# Altium PCB HairColorDispenser.PcbDoc
Units mil, origin at the board's own origin, x right, y up, seen from the top; angles counter-clockwise.
Board outline 3661.42 x 3031.5 mil, 2 copper layers (Top Layer, Bottom Layer), stack 12.8 mil thick; 96 components, 84 nets, 337 pads, 99 vias.
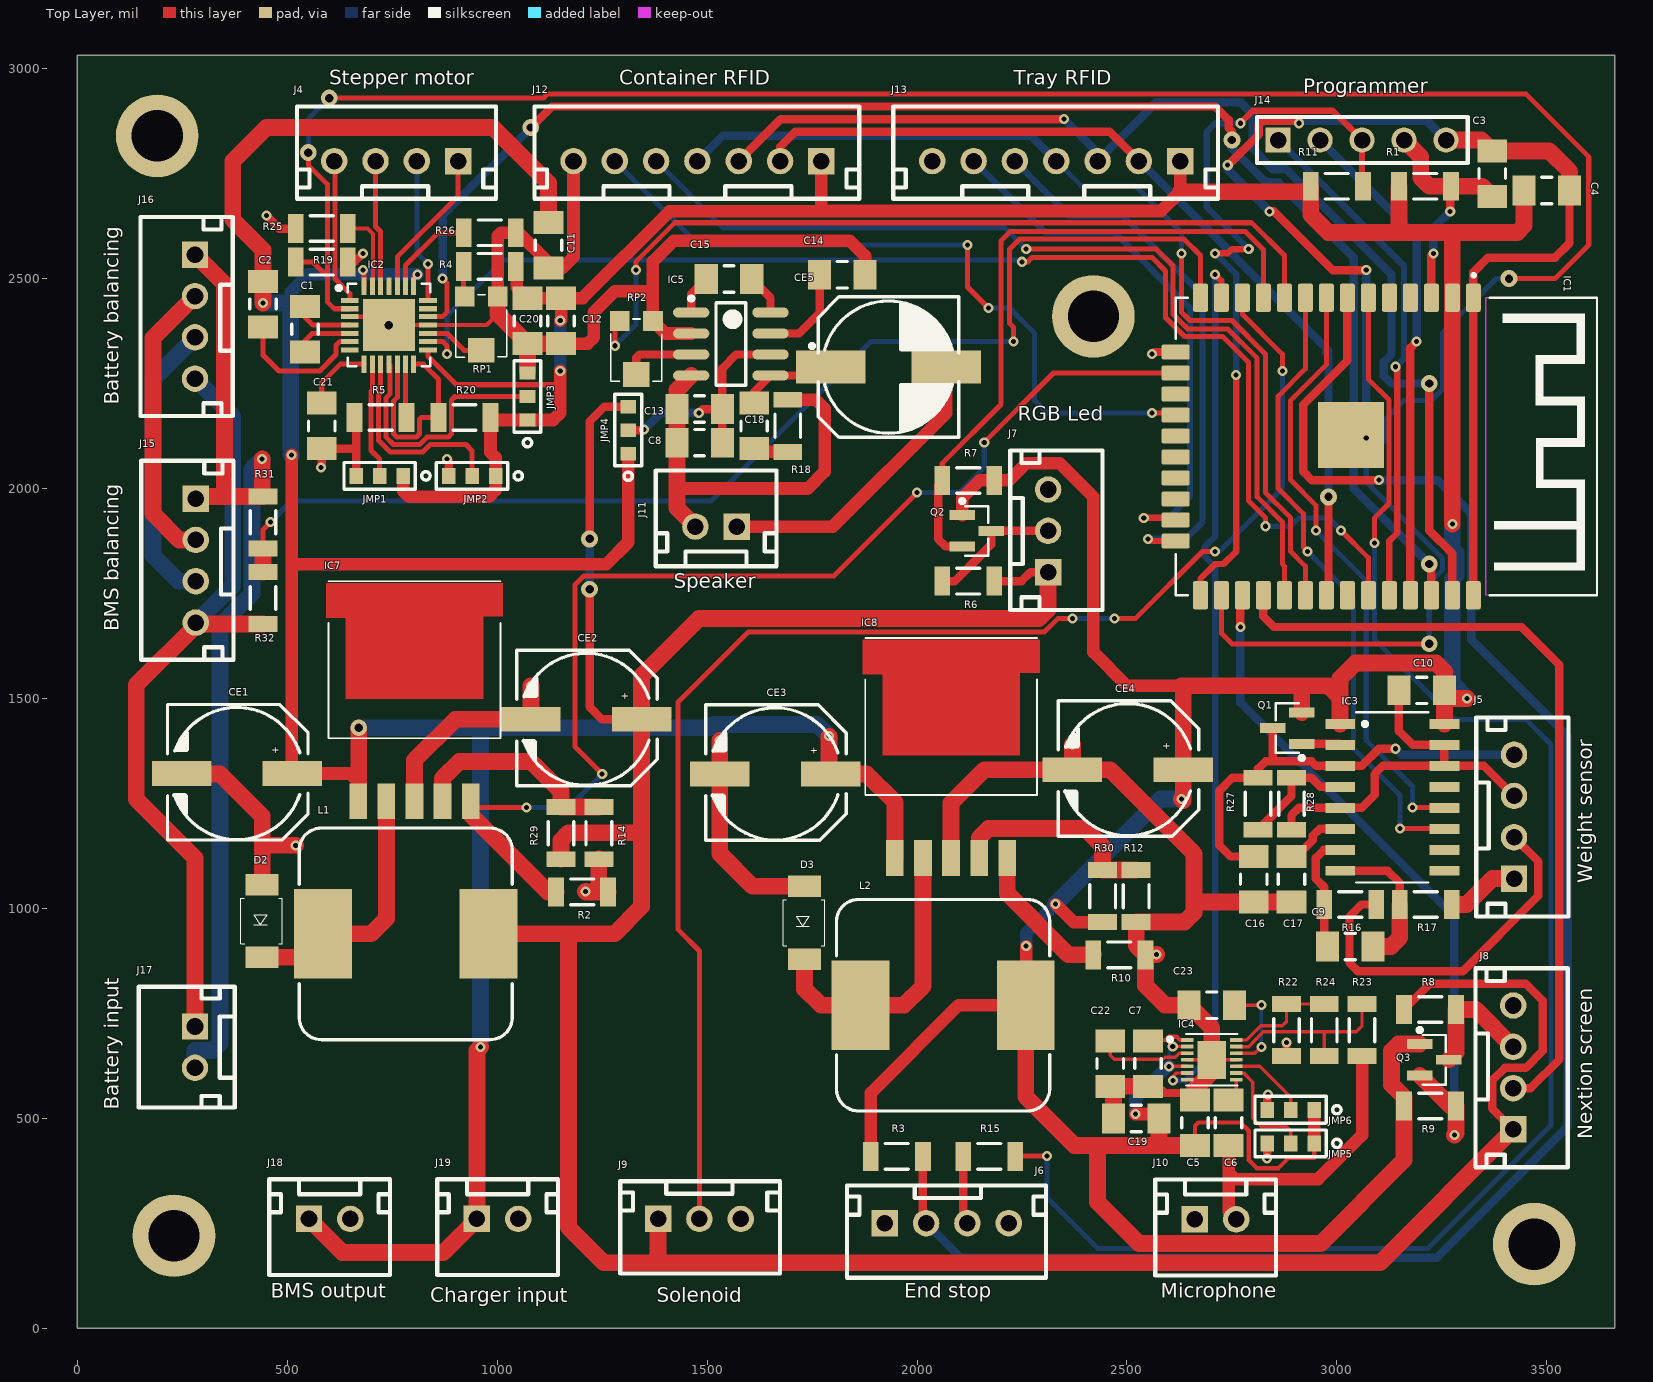
[diagram p0: Top Layer view]
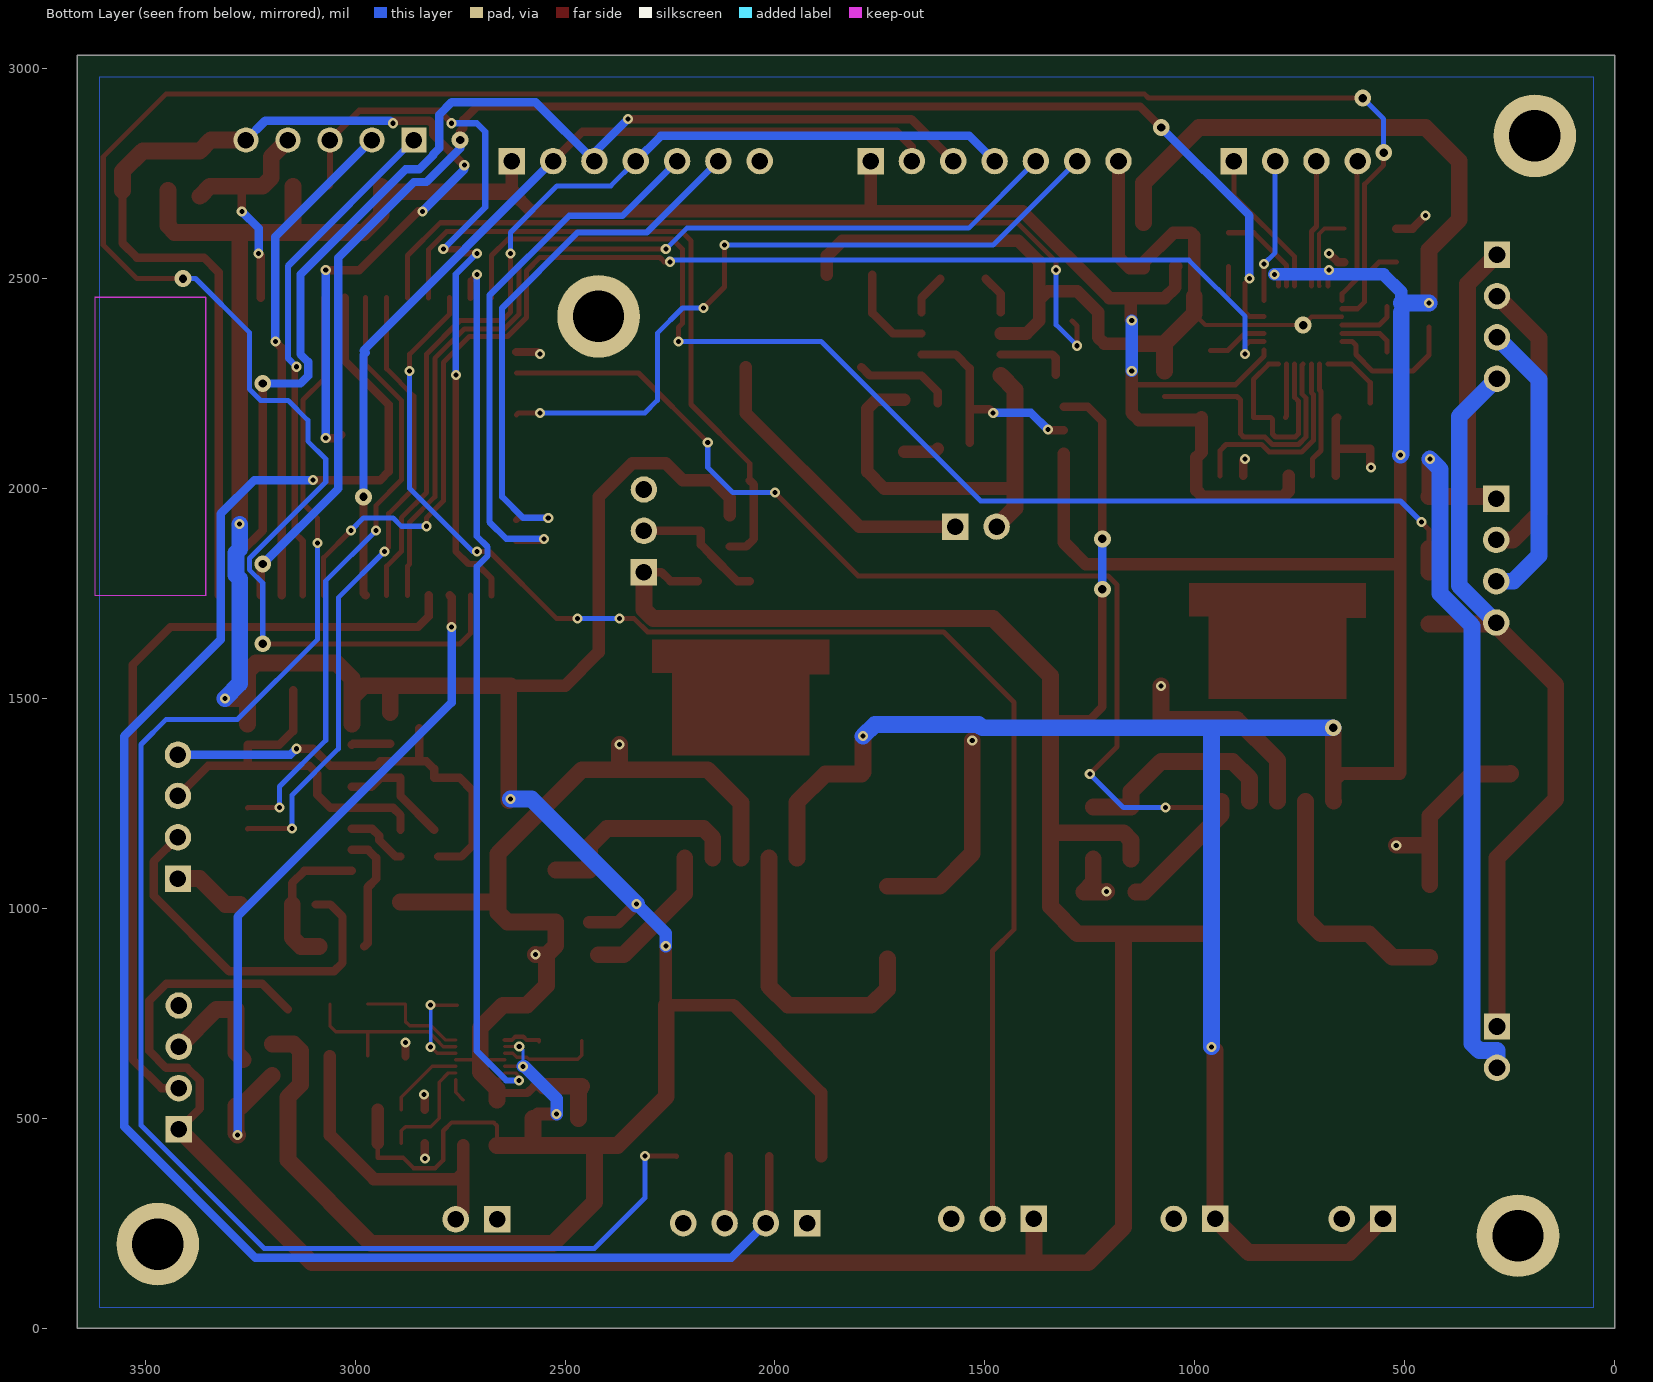
[diagram p1: Bottom Layer view, seen from below]

## Layer stack, top to bottom
Top Solder: solder mask 0.4, Solder Resist, Dk 3.5
Top Layer: signal copper 1.4
Dielectric 1: core 10, FR-4, Dk 4.2
Bottom Layer: signal copper 1.4
Solder Side: solder mask 0.4, Solder Resist, Dk 3.5

## Board outline
0,0 0,3031.5 3661.42,3031.5 3661.42,0

## Design rules (kind name [scope] priority, off if disabled: settings)
Clearance Clearance_1 [InComponent('IC2')] p1: gap=6
Clearance "Clearance Poly" [InPoly] p2: gap=16
Clearance [All] p3: gap=6
DiffPairsRouting [All] p1: maxlimit=10 minlimit=10 mostfreqgap=10 toplayer_minwidth=10 toplayer_maxwidth=10 toplayer_prefwidth=10 bottomlayer_minwidth=10 bottomlayer_maxwidth=10 bottomlayer_prefwidth=10 maxuncoupledlength=500
HoleSize [All] p1: absolutevalues=TRUE maxlimit=500 minlimit=1 maxpercent=80.000 minpercent=20.000
MinimumSolderMaskSliver [All] p1: minsoldermaskwidth=1
PolygonConnect PolygonConnect_Via [IsVia] p1: connectstyle=Direct reliefconductorwidth=10 reliefentries=4 polygonreliefangle="90 Angle" airgapwidth=10
PolygonConnect [All] p2: connectstyle=Relief reliefconductorwidth=10 reliefentries=4 polygonreliefangle="90 Angle" airgapwidth=10
RoutingVias [All] p1: holewidth=12 width=24 viastyle="Through Hole" minholewidth=12 minwidth=24 maxholewidth=100 maxwidth=100
SilkToSilkClearance [All] p1: silktosilkclearance=5
SilkToSolderMaskClearance [IsPad] p1: minsilkscreentomaskgap=5 clearancetoexposedcopper=TRUE
SolderMaskExpansion [All] p1: expansion=4
Width [All] p1: maxlimit=80 minlimit=6 preferedwidth=10
25 further rules are at their usual default settings.

## Components (designator, comment, footprint, x,y, rotation, side; value= is the part's Value field where it differs from the comment)
C1 "100n" CAPC3216X18N 541.97,2379.13 r270 top
C2 "100n" CAPC3216X18N 441.97,2439.13 r90 top
C3 "100n" CAPC3216X18N 3370,2750 r270 top
C4 "100n" CAPC3216X18N 3500,2710 r180 top
C5 "100n" CAPC3216X18N 2661.97,489.13 r270 top
C6 "100n" CAPC3216X18N 2741.97,489.13 r90 top
C7 "100n" CAPC3216X18N 2550,630 r90 top
C8 "100n" CAPC3216X18N 1481.97,2109.13 r0 top
C9 "100n" CAPC3216X18N 3031.97,909.13 r180 top
C10 "100n" CAPC3216X18N 3201.97,1519.13 r0 top
C11 "100n" CAPC3216X18N 1121.97,2579.13 r90 top
C12 "100n" CAPC3216X18N 1151.97,2399.13 r90 top
C13 "10uF" CAPC3216X18N 1481.97,2189.13 r0 top
C14 "10uF" CAPC3216X18N 1821.97,2509.13 r180 top
C15 "10uF" CAPC3216X18N 1551.97,2499.13 r0 top
C16 "1uF" CAPC3216X18N 2801.97,1069.13 r90 top
C17 "1uF" CAPC3216X18N 2891.97,1069.13 r90 top
C18 "10p" CAPC3216X18N 1611.97,2149.13 r270 top
C19 "2u2" CAPC3216X18N 2521.97,499.13 r0 top
C20 "2u2" CAPC3216X18N 1071.97,2399.13 r90 top
C21 "220n" CAPC3216X18N 581.97,2149.13 r90 top
C22 "2u2" CAPC3216X18N 2460,630 r90 top
C23 "470n" CAPC3216X18N 2701.97,769.13 r0 top
CE1 "220uF" "220uF 35V" 380,1320 r0 top
CE2 "220uF" "220uF 35V" 1211.97,1449.13 r0 top
CE3 "220uF" "220uF 35V" 1661.97,1319.13 r0 top
CE4 "220uF" "220uF 35V" 2501.97,1329.13 r0 top
CE5 "100u 25V" CAPAE800X550N 1931.97,2289.13 r0 top
D2 "1N5824" SOD128 440,970 r90 top
D3 "1N5824" SOD128 1731.97,965.75 r90 top
IC1 "ESP32-WROOM-32" MODULE_ESP-WROOM-32 3000,2100 r270 top
IC2 "A4988" "28-QFN (5x5)" 741.97,2389.13 r0 top
IC3 "HX711" SOP16 3131.97,1279.13 r0 top
IC4 "MAX9814" "14-WFDFN Exposed Pad" 2701.97,639.13 r0 top
IC5 "LM386" SOIC-8 1556.46,2344.13 r0 top
IC7 "LM2596 Adj" TO263-5 668.97,1255.13 r0 top
IC8 "LM2596 Adj" TO263-5 1947.18,1120.13 r0 top
J4 "Stepper motor" B4B-HX-A 906.85,2780 r180 top
J5 "Weight Sensor" B4B-HX-A 3421.97,1070.71 r90 top
J6 "QRD1114" B4B-HX-A 1923.15,250 r0 top
J7 "WS2812B" B3B-HX-A 2311.97,1800.71 r90 top
J8 "Nextion" B4B-HX-A 3420,473.15 r90 top
J9 "WS2812B" B3B-HX-A 1383.15,260 r0 top
J10 "Microphone" B2B-XH-A 2661.97,259.13 r0 top
J11 "Speaker" B2B-XH-A 1570.39,1909.13 r180 top
J12 "RFID Container" B7B-HX-A 1772.13,2780 r180 top
J13 "RFID Tray" B7B-HX-A 2626.85,2780 r180 top
J14 "Programmer" HEADER1X5 3010,2830 r0 top
J15 "Balancing BMS" B4B-HX-A 281.97,1975.98 r270 top
J16 "Balancing Battery" B4B-HX-A 280,2556.85 r270 top
J17 "Battery Input" B2B-XH-A 280,718.43 r270 top
J18 "BMS Output" B2B-XH-A 551.57,260 r0 top
J19 "Charger Input" B2B-XH-A 951.57,260 r0 top
JMP1 "0R" JMP_SOLDER_3 720,2030 r180 top
JMP2 "0R" JMP_SOLDER_3 940,2030 r180 top
JMP3 "0R" JMP_SOLDER_3 1071.97,2219.13 r90 top
JMP4 "0R" JMP_SOLDER_3 1311.97,2139.13 r90 top
JMP5 "0R" JMP_SOLDER_3 2890,440 r180 top
JMP6 "0R" JMP_SOLDER_3 2890,520 r180 top
L1 "33uH 3A" "33uH 3A" 781.97,939.13 r0 top
L2 "33uH 3A" "33uH 3A" 2061.97,769.13 r0 top
Q1 "MMBT4403" SOT95P230X126-3N 2881.97,1429.13 r180 top
Q2 "2N7002" SOT95P230X126-3N 2141.97,1899.13 r0 top
Q3 "2N7002" SOT95P230X126-3N 3231.97,639.13 r0 top
R1 "10K" "SMD 1206" 3210,2720 r180 top
R2 "10K" "SMD 1206" 1201.97,1039.13 r180 top
R3 "10K" "SMD 1206" 1951.97,409.13 r180 top
R4 "10K" "SMD 1206" 981.97,2529.13 r0 top
R5 "10K" "SMD 1206" 721.97,2169.13 r0 top
R6 "10K" "SMD 1206" 2121.97,1779.13 r180 top
R7 "10K" "SMD 1206" 2121.97,2019.13 r0 top
R8 "10K" "SMD 1206" 3221.97,759.13 r0 top
R9 "10K" "SMD 1206" 3221.97,529.13 r180 top
R10 "10K" "SMD 1206" 2481.97,889.13 r180 top
R11 "10K" "SMD 1206" 3000,2720 r0 top
R12 "1K" "SMD 1206" 2521.97,1029.13 r90 top
R14 "1K" "SMD 1206" 1241.97,1179.13 r90 top
R15 "100R" "SMD 1206" 2171.97,409.13 r180 top
R16 "100R" "SMD 1206" 3031.97,1009.13 r180 top
R17 "100R" "SMD 1206" 3211.97,1009.13 r180 top
R18 "100R" "SMD 1206" 1691.97,2149.13 r90 top
R19 "100K" "SMD 1206" 581.97,2539.13 r0 top
R20 "100K" "SMD 1206" 921.97,2169.13 r0 top
R22 "100K" "SMD 1206" 2880,710 r90 top
R23 "2K2" "SMD 1206" 3060,710 r270 top
R24 "150K" "SMD 1206" 2970,710 r270 top
R25 "0R05" "SMD 1206" 581.97,2619.13 r180 top
R26 "0R05" "SMD 1206" 981.97,2609.13 r0 top
R27 "20K" "SMD 1206" 2811.97,1249.13 r270 top
R28 "8.2K" "SMD 1206" 2891.97,1249.13 r90 top
R29 "3.09K" "SMD 1206" 1151.97,1179.13 r90 top
R30 "1.69K" "SMD 1206" 2441.97,1029.13 r90 top
R31 "33K" "SMD 1206" 441.97,1919.13 r90 top
R32 "10K" "SMD 1206" 441.97,1739.13 r90 top
RP1 "10K" "SMD POT" 1001.34,2457.09 r180 top
RP2 "10K" "SMD POT" 1370.71,2399.13 r180 top

## Footprints (in the part's own frame and the unit in brackets; to place one, negate y for a bottom-side part, rotate by r counter-clockwise, add the part's x,y. Pads: shape width x height; smd on the part's side, far side on the other; paste and mask are expansions set on the pad)
"14-WFDFN Exposed Pad" [mm] "14-WFDFN Exposed Pad (3x3)"
  rect 0.76x0.22 smd: 1(-1.485,1.2) 2(-1.485,0.8) 3(-1.485,0.4) 4(-1.485,0) 5(-1.485,-0.4) 6(-1.485,-0.8) 7(-1.485,-1.2) 8(1.485,-1.2) 9(1.485,-0.8) 10(1.485,-0.4) 11(1.485,0) 12(1.485,0.4) 13(1.485,0.8) 14(1.485,1.2)
  rect 1.7x2.3 smd: 15(0,0)
  silkscreen extent -2.65,-1.55 1.55,1.55, body extent -1.51,-1.5 1.5,1.5, height 0.73
"28-QFN (5x5)" [mil] "28-VFQFN Exposed Pad (5x5)"
  rect 42x12 smd: 1(-93,59) 2(-93,39) 3(-93,20) 4(-93,0) 5(-93,-20) 6(-93,-39) 7(-93,-59) 15(93,-59) 16(93,-39) 17(93,-20) 18(93,0) 19(93,20) 20(93,39) 21(93,59)
  rect 12x42 smd: 8(-59,-93) 9(-39,-93) 10(-20,-93) 11(0,-93) 12(20,-93) 13(39,-93) 14(59,-93) 22(59,93) 23(39,93) 24(20,93) 25(0,93) 26(-20,93) 27(-39,93) 28(-59,93)
  rect 124x124 smd: 29(0,0)
  silkscreen extent -124,-98 98,98, body extent -98,-98 98,98, height 39
"33uH 3A" [mm] "Precision Wire Wound Inductor, 2-Leads, Body 12.5x12.5mm, IPC Low Density"
  rect 3.5x5.4 smd: 1(-5,0) 2(5,0)
  silkscreen extent -6.45,-6.4 6.45,6.4, body extent -6.25,-6.25 6.25,6.25, height 7.5
"220uF 35V" [mm] "Molded Capacitor, 2-Leads, Body 8x10mm, IPC Medium Density"
  rect 3.6x1.5 smd: 1(3.35,0.025) 2(-3.35,0.025)
  silkscreen extent -4.2,-4 4.3,4.2, body extent -4,-3.97 4,4.03, height 10
B2B-XH-A [mm]
  rect 1.6x1.6 hole 1: 1(0,0)
  round 1.6 hole 1: 2(2.5,0)
  silkscreen extent -2.4,-3.4 4.9,2.4, body extent -2.45,-3.38 4.95,2.37, height 7
B3B-HX-A [mm] "HEADER, TOP ENTRY, 3WAY, 2MM"
  rect 1.6x1.6 hole 1: 1(0,0)
  round 1.6 hole 1: 2(2.5,0) 3(5,0)
  silkscreen extent -2.29,-3.3 7.37,2.29, body extent -2.41,-3.38 7.49,2.37, height 7
B4B-HX-A [mm] "HEADER, TOP ENTRY, 4WAY, 2MM"
  rect 1.6x1.6 hole 1: 1(0,0)
  round 1.6 hole 1: 2(2.5,0) 3(5,0) 4(7.5,0)
  silkscreen extent -2.29,-3.3 9.75,2.29, body extent -2.44,-3.31 9.96,2.44, height 7
B7B-HX-A [mm] "HEADER, TOP ENTRY, 4WAY, 2MM"
  rect 1.6x1.6 hole 1: 1(0,0)
  round 1.6 hole 1: 2(2.5,0) 3(5,0) 4(7.5,0) 5(10,0) 6(12.5,0) 7(15,0)
  silkscreen extent -2.29,-3.3 17.37,2.29, body extent -2.4,-3.4 17.49,2.37, height 7
CAPAE800X550N [mm] "Molded Capacitor, 2-Leads, Body 8.3x8.3mm, IPC Medium Density"
  rect 4.2x2 smd: 1(-3.5,0) 2(3.5,0)
  silkscreen extent -4.75,-4.25 4.25,4.25, body extent -4.02,-3.99 3.98,4.01, height 5.5
CAPC3216X18N [mm] "Chip Capacitor, 2-Leads, Body 3.20x1.60mm, IPC Medium Density"
  rect 1.4x1.8 smd: 1(-1.375,0) 2(1.375,0)
  silkscreen extent -0.3,-0.8 0.3,0.8, body extent -1.68,-0.87 1.67,0.87, height 1.8
HEADER1X5 [mil]
  rect 60x60 hole 39.37: 1(-150,0)
  round 60 hole 39.37: 2(-50,0) 3(50,0) 4(150,0) 5(250,0)
  silkscreen extent -200,-55 302,55, body extent -200,-50 300,50, height 286
JMP_SOLDER_3 [mil] "3 X 0603"
  rect 32x38 smd: 1(-56,0) 2(0,0)
  rect 32x38 smd paste+0 mask+0: 3(56,0)
  silkscreen extent -120,-32 85,32, body extent -72,-19 16,19, height 24
MODULE_ESP-WROOM-32 [mm]
  rrect22% 1.7x0.9 smd: 1(-9,8.255) 2(-9,6.985) 3(-9,5.715) 4(-9,4.445) 5(-9,3.175) 6(-9,1.905) 7(-9,0.635) 8(-9,-0.635) 9(-9,-1.905) 10(-9,-3.175) 11(-9,-4.445) 12(-9,-5.715) 13(-9,-6.985) 14(-9,-8.255) 25(9,-8.255) 26(9,-6.985) 27(9,-5.715) 28(9,-4.445) 29(9,-3.175) 30(9,-1.905) 31(9,-0.635) 32(9,0.635) 33(9,1.905) 34(9,3.175) 35(9,4.445) 36(9,5.715) 37(9,6.985) 38(9,8.255)
  rect 4x4 smd: 1.1(-0.7,0.845)
  rrect22% 0.9x1.7 smd: 15(-5.715,-9.755) 16(-4.445,-9.755) 17(-3.175,-9.755) 18(-1.905,-9.755) 19(-0.635,-9.755) 20(0.635,-9.755) 21(1.905,-9.755) 22(3.175,-9.755) 23(4.445,-9.755) 24(5.715,-9.755)
  Keep-Out Layer region: 9,9.026 -9.026,9.026 -9.026,15.75 9,15.75
  Keep-Out Layer region: 9,9.012 -9.012,9.012 -9.012,15.75 9,15.75
  Keep-Out Layer region: 9,9.024 -9.024,9.024 -9.024,15.75 9,15.75
  silkscreen extent -10.46,-9.75 9,15.75, body extent -9.05,-9.8 9.02,15.74, height 3
"SMD 1206" [mm]
  rect 0.95x1.75 smd: 1(-1.575,0) 2(1.575,0)
  silkscreen extent -0.7,-0.77 0.7,0.77, body extent -1.6,-0.85 1.6,0.85, height 0.55
"SMD POT" [mm]
  rect 1.2x1.2 smd: 1(0,0) 3(2,0)
  rect 1.6x1.5 smd: 2(1,3.25)
  silkscreen extent -0.54,-0.12 2.55,3.66, body extent -0.54,-0.13 2.56,3.65, height 1.01
SOD128 [mm] "SOD128"
  rect 1.3x2 smd: 1(-2.2,0) 2(2.2,0)
  silkscreen extent -1.39,-1.22 1.38,1.3, body extent -2.45,-1.35 2.55,1.35, height 1.1
SOIC-8 [mm] "SOIC, 8-Leads, Body 5.0x4.0mm (max), Pitch 1.27mm, IPC Medium Density"
  oval 2.2x0.6 smd: 1(-2.4,1.905) 2(-2.4,0.635) 3(-2.4,-0.635) 4(-2.4,-1.905) 5(2.4,-1.905) 6(2.4,-0.635) 7(2.4,0.635) 8(2.4,1.905)
  silkscreen extent -2.52,-2.5 0.9,2.88, body extent -2,-2.5 2,2.5, height 1.75
SOP16 [mm] "SOIC, 8-Leads, Body 5.0x4.0mm (max), Pitch 1.27mm, IPC Medium Density"
  rect 1.8x0.59 smd: 1(-3.155,4.064) 2(-3.155,2.794) 3(-3.155,1.524) 4(-3.155,0.254) 5(-3.155,-1.016) 6(-3.155,-2.286) 7(-3.155,-3.556) 8(-3.155,-4.826) 9(3.155,-4.826) 10(3.155,-3.556) 11(3.155,-2.286) 12(3.155,-1.016) 13(3.155,0.254) 14(3.155,1.524) 15(3.155,2.794) 16(3.155,4.064)
  silkscreen extent -2.2,-5.53 2.2,4.77, body extent -3.96,-5.48 3.96,4.72, height 1.8
SOT95P230X126-3N [mm] "SOT23, 3-Leads, Body 3.0x2.5mm (max), Pitch 0.95mm, IPC Medium Density"
  rect 1.55x0.6 smd: 1(-0.875,0.95) 2(-0.875,-0.95) 3(0.875,0)
  silkscreen extent -1,-1.5 0.7,1.92, body extent -1.33,-1.48 1.23,1.44, height 1.07
TO263-5 [mm]
  rect 1.07x2.17 smd: 1(0,0) 2(1.7,0) 3(3.4,0) 4(5.1,0) 5(6.8,0)
  Top Layer region: -0.75,11.1 -0.75,6.2 7.55,6.2 7.55,11.2 8.75,11.2 8.75,13.2 -1.95,13.2 -1.95,11.1
  silkscreen extent -1.8,3.8 8.6,13.3, body extent -1.72,-0.82 8.5,13.22, height 4.38

## Part data
C1 C2: library part "100n 25V NP0", "CAP CER 0.1UF 25V NP0 1206"
C3 C4 C5 C6 C7 C8 C9 C10 C11 C12: library part "100n 50V X7R", "CAP CER 0.1UF 50V X7R 1206"
C13 C14 C15: library part "10uF 25V X7R", "CAP CER 10UF 25V X5R 1206"
C16 C17: library part "1uF 25V X7R", "CAP CER 1UF 25V X7R 1206"
C18: library part "10p 50V X7R", "CAP CER 10pF 50V NP0 1206"
C19 C20 C22: library part "2u2 50V X7R", "CAP CER 2.2UF 50V X7R 1206"
C21: library part "220n 50V X7R", "CAP CER 0.22UF 50V X7R 1206"
C23: library part "470n 25V X7R", "CAP CER 0.47UF 25V X7R 1206"
CE1 CE2 CE3 CE4: library part "220u 35V", "CAP ALUM 220UF 20% 35V SMD"
CE5: library part "100u 25V h=5.4mm", "CAPAE800X700 CASE E PANASONIC_EEEFK1E101P"
D2 D3: "DIODE SCHOTTKY 30V 5A MFLAT"
IC1: "Bluetooth, WiFi Transceiver Module 2.4GHz ~ 2.5GHz Surface Mount"
IC2: "IC MTR DRVR BIPOLAR 3-5.5V 28QFN"
IC3: "LOAD CELL AMP HX711"
IC4: "IC AMP CLASS AB MONO 14TDFN"
IC5: "IC AMP AUDIO PWR .325W AB 8SOIC"
IC7 IC8: "IC REG MULT CONFG ADJ 3A D2PAK-5"
J4 J5 J6 J8 J15 J16: library part "JST 4-Pin 2.5mm B4B-XH-A", "CONN HEADER XH TOP 2POS 2.5MM"
J7 J9: library part "JST 3-Pin 2.5mm B3B-XH-A", "CONN HEADER XH TOP 2POS 2.5MM"
J10 J11 J17 J18 J19: library part "JST 2-Pin 2.5mm B2B-XH-A", "CONN HEADER XH TOP 2POS 2.5MM"
J12 J13: library part "JST 7-Pin 2.5mm B7B-XH-A", "CONN HEADER VERT 7POS 2.5MM"
J14: library part "Header 1x5", "CONN HEADER VERT 5POS 2.54MM"
JMP1 JMP2 JMP3 JMP4 JMP5 JMP6: library part "JMP-3 0R0 0603", "Solder Jumper 3x0603"
L1 L2: library part "IND 33u 3A", "FIXED IND 33UH 3A 60 MOHM SMD"
Q1: "PNP 40V 600mA 200MHz 300mW SOT-23-3"
Q2 Q3: "MOSFET N-CH 60V 115mA SOT-23"
R1 R2 R3 R4 R5 R6 R7 R8 R9 R10 R11 R32: library part "10K 1% 0.25W", "RES SMD 10K OHM 1% 1/4W 1206"
R12 R14: library part "1K 1% 0.25W", "RES SMD 1K OHM 1% 1/4W 1206"
R15 R16 R17 R18: library part "100R 1% 0.25W", "RES SMD 100 OHM 1% 1/4W 1206"
R19 R20 R22: library part "100K 1% 0.25W", "RES SMD 100K OHM 1% 1/4W 1206"
R23: library part "2K2 1% 0.25W", "RES SMD 2.2K OHM 1% 1/4W 1206"
R24: library part "150K 1% 0.25W", "RES SMD 150K OHM 1% 1/4W 1206"
R25 R26: library part "0R05 0.5% 0.5W", "RES 50M OHM 0.5% 1/2W 1206"
R27: library part "20K 1% 0.25W", "RES SMD 20K OHM 1% 1/4W 1206"
R28: library part "8K2 1% 0.25W", "RES SMD 8.2K OHM 5% 1/4W 1206"
R29: library part "3.09K 1% 0.25W", "RES SMD 3.09K OHM 1% 0.25W 1206"
R30: library part "1.69K 1% 0.25W_1", "RES SMD 1.69K OHM 1% 0.25W 1206"
R31: library part "33K 1% 0.25W", "RESISTOR, POWER, 1206, 1%, 33K"
RP1 RP2: library part "10k POT SMD", "TRIMMER 10K OHM 0.1W SMD"

## Free pads (board coordinates)
  round 196.85 hole 122.05: 0(190,2840) 0(230,220) 0(2420,2410) 0(3470,200)

## Via types
v1: diameter 24, hole 12, Top Layer to Bottom Layer, 86 vias
v2: diameter 40, hole 20, Top Layer to Bottom Layer, 13 vias

## Nets (pads, with @x,y where several pads share a name; then routed paths per layer and width w, separated by ;. In a path a pad name is that pad's centre, name@x,y a point inside that pad or via, vN(x,y) a via of type N, cw(c..) or ccw(c..) an arc to the next point about the centre after c; other vN are vias at no path point)
3V3: C4.2 C5.2 C10.2 C12.2 C19.2 C20.2 CE4.1 IC1.2 IC2.15 IC3.1 IC3.16 IC4.2 IC4.5 J12.1 J13.1 JMP1.1 JMP2.1 JMP3.1 JMP5.1 JMP6.1 L2.2 Q1.2 Q2.1 Q3.1 R1.2 R3.2 R4.2 R7.2 R9.2 R11.1 R20.2 R30.1 | length 12151.7
  Top Layer w8: v1(2600,623.39) IC4.5 ; v1(2609.06,670.94) 2610.14,670.94 2610.45,670.63 IC4.2
  Top Layer w10: C5.2 2661.97,481.97 2670,490 2770,490 2790,470 2790,400 2809,381 2861,381 2886,406 2946,406 JMP5.1
  Top Layer w12: IC2.15 834.97,2315.03 902.87,2247.13 1150,2247.13 ; 1103.13,2163.13 1110,2170
  Top Layer w30: JMP1.1 776,1994 790,1980 980,1980 996,1996 JMP2.1 996,2074 983.98,2086.02 R20.2 989.98,2163.13 JMP3.1 1103.13,2163.13 1133.13,2163.13 1150,2180 1150,2247.13 v1(1150,2280) ; R4.2 1045.96,2529.13 1045.96,2479.28 C20.2 C12.2 ; v1(1150,2400) 1151.97,2401.97 C12.2 ; J12.1 1772.13,2660 ; R3.2 1889.96,559.96 2099.13,769.13 L2.2 2260,770.32 v1(2260,910) ; Q2.1 2107.52,1977.52 2149.13,2019.13 R7.2 2219.13,2019.13 2260,2060 2340,2060 2420,1980 2420,1610 2500,1530 2630,1530 ; v1(2330,1010) 2372.87,967.13 R30.1 ; v1(2520,510) 2565.24,510 C19.2 ; J13.1 2626.85,2706.85 2581,2661 1773.13,2661 1772.13,2660 ; JMP5.1 JMP6.1 ; C12.2 1203.27,2453.27 1410,2660 1772.13,2660
  Top Layer w40: L2.2 2258.82,551.18 2375,435 2430,435 ; C19.2 2576.1,443.9 2585,435 ; 2626.85,2706.85 2924.84,2706.85 R11.1 2937.99,2652.01 2980,2610 3150,2610 ; v1(2630,1260) 2633.86,1256.14 CE4.1 2633.86,1530 ; 2630,1530 2633.86,1530 ; C5.2 2585,435 ; Q1.2 2916.42,1523.58 2910,1530 ; IC3.1 3007.76,1502.24 ; R1.2 3147.99,2612.01 3150,2610 ; Q3.1 3146.54,676.54 3130,660 3130,580 3159.96,550.04 R9.2 3159.96,399.96 2961.64,201.64 2528.36,201.64 2430,300 2430,435 ; IC3.16 3256.1,1439.21 C10.2 ; v1(3275,1915) IC1.2 3275,2605 3280,2610 ; v1(3310,1500) 3275.24,1500 C10.2 ; C4.2 3445.87,2625.87 3430,2610 3280,2610 ; 2430,435 2585,435 ; 2633.86,1530 2910,1530 ; 2910,1530 2980,1530 3007.76,1502.24 ; 3007.76,1502.24 3007.76,1547.76 3044,1584 3236,1584 3256.1,1563.9 C10.2 ; 3150,2610 3280,2610
  Bottom Layer w8: v1(2600,623.39) 2600,661.88 v1(2609.06,670.94)
  Bottom Layer w30: v1(1150,2280) v1(1150,2400) ; v1(2260,910) 2260,940 v1(2330,1010) ; v1(2520,510) 2520,546.67 2596.72,623.39 v1(2600,623.39)
  Bottom Layer w40: v1(2330,1010) 2580,1260 v1(2630,1260) ; v1(3275,1915) 3275,1855.51 3284,1846.51 3284,1793.49 3275,1784.49 3275,1535 v1(3310,1500)
5V: CE2.1 J7.1 J8.1 J9.1 JMP4.3 L1.2 R6.1 R8.1 R29.1 | length 7369.2
  Top Layer w20: v2(1220,1760) 1220,1480 1249.88,1450.12 CE2.1 ; v2(1220,1880) 1220,2160 1255.13,2195.13 JMP4.3 ; R6.1 2249.13,1779.13 2270.71,1800.71 J7.1 ; R8.1 3220.83,820 3450,820 3490,780 3490,660 3450,620 3400,620 3370,590 3370,523.15 J8.1
  Top Layer w40: L1.2 1170,939.13 ; R29.1 1151.97,1161.97 1170,1180 1343.86,1180 ; J9.1 1383.15,162.49 1390,155.64 ; J7.1 2311.97,1711.97 2290,1690 1480,1690 1343.86,1553.86 CE2.1 1343.86,1180 ; J8.1 3102.49,155.64 1390,155.64 ; 1170,939.13 1170,240 1254.36,155.64 1390,155.64 ; 1170,939.13 1279.13,939.13 1343.86,1003.86 1343.86,1180
  Bottom Layer w20: v2(1220,1760) v2(1220,1880)
12V: C2.2 C11.2 CE1.1 CE3.1 IC2.22 IC2.28 IC7.1 IC8.1 J18.1 J19.1 JMP4.1 | length 7508.1
  Top Layer w12: v1(680.68,2520) 682.97,2517.71 IC2.28 ; IC2.22 800.97,2500.97 v1(810,2510)
  Top Layer w30: v1(510,2080) 510,1820 ; IC7.1 668.97,1301.03 649.02,1320.98 CE1.1 510,1322.87 510,1820 ; JMP4.1 1311.97,1871.97 1260,1820 510,1820
  Top Layer w40: v1(441.97,2441.97) C2.2 441.97,2568.03 370,2640 370,2780 450,2860 990,2860 1121.97,2728.03 C11.2 ; J18.1 631.57,180 871.57,180 J19.1 951.57,661.57 v1(960,670) ; IC7.1 670,1256.17 v2(670,1430) ; v1(1790,1410) 1790,1323.98 CE3.1 1793.98,1320 1880,1320 1947.18,1252.82 IC8.1
  Bottom Layer w30: 508.03,2420 508.03,2441.97 508.03,2468.03 550,2510 v1(810,2510)
  Bottom Layer w40: v1(441.97,2441.97) 508.03,2441.97 ; 508.03,2420 508.03,2081.97 v1(510,2080) ; v2(670,1430) 960,1430 ; v1(960,670) 960,1430 ; v1(1790,1410) 1762,1438 1514.26,1438 1506.26,1430 960,1430
B1: J15.3 J16.3 | length 688.6
  Bottom Layer w40: J16.3 180,2260 180,1840 240.87,1779.13 J15.3
B2: J15.2 J16.2 | length 687.7
  Top Layer w40: J16.2 180,2358.43 180,1940 242.44,1877.56 J15.2
B+: J15.1 J16.1 J17.2 R31.2 | length 2397.5
  Top Layer w40: J16.1 350,2486.85 350,1981.14 ; J15.1 287.13,1981.14 350,1981.14 ; v1(440,2070) 440,1983.11 R31.2 350,1981.14
  Bottom Layer w40: J17.2 280,660.93 322.27,660.93 339.46,678.13 339.46,1673.15 416,1749.69 416,2046 v1(440,2070)
B-: J15.4 J16.4 J17.1 R32.1 | length 1888
  Top Layer w40: J17.1 280,1120 140,1260 140,1531.57 285.55,1677.13 R32.1
  Bottom Layer w40: J16.4 370,2171.57 370,1768.74 J15.4
EN: C3.2 IC1.3 J14.4 R1.1 | length 580
  Top Layer w20: IC1.3 3225,2555 v1(3230,2560) ; v1(3270,2660) 3270,2717.99 R1.1
  Top Layer w40: J14.4 3200,2790 3200,2740 3220,2720 R1.1 3345.87,2720 C3.2
  Bottom Layer w20: v1(3230,2560) 3230,2620 v1(3270,2660)
GND: C3.1 C4.1 C5.1 C7.1 C8.1 C10.1 C11.1 C12.1 C13.1 C14.1 C16.1 C17.1 C19.1 C20.1 C21.1 C22.1 C23.1 CE1.2 CE2.2 CE3.2 CE4.2 D2.2 D3.2 IC1.1 IC1.1.1 IC1.15 IC1.38 IC2.3 IC2.18 IC2.29 IC3.5 IC3.14 IC3.15 IC4.4 IC4.7 IC4.11 IC4.15 IC5.2 IC5.4 IC7.3 IC8.3 J5.3 J6.1 J6.4 J7.3 J8.4 J9.3 J10.1 J11.2 J12.7 J13.7 J14.5 J18.2 J19.2 JMP1.3 JMP2.3 JMP3.3 JMP5.3 JMP6.3 R2.1 R5.1 R10.1 R12.1 R14.1 R18.2 R19.2 R22.1 R25.2 R26.2 R28.1 RP1.1 RP2.1 | length 12060.2
  Top Layer w8: IC4.7 2644.92,593.31 2662.61,593.31 IC4.15@2701.97,632.67 ; IC4.4 IC4.15 IC4.11
  Top Layer w10: IC2.3 721.97,2409.13 v2(741.97,2389.13) IC2.18 974.84,2389.13 1001.34,2415.63
  Top Layer w20: v1(450,2650) 480.87,2619.13 R25.2 ; v1(580,2050) 581.97,2051.97 C21.1 661.45,2095 664,2097.55 ; R19.2 659.13,2539.13 v1(680,2560) ; R5.1 664,2165.09 664,2097.55 ; JMP1.3 664,2097.55 ; v1(880,2070) 884,2066 JMP2.3 ; C7.1 2574.13,575.87 2590,560 2645.24,560 C5.1 ; v1(2560,2320) 2565,2325 IC1.15 ; v1(2740,2770) 2740.91,2770 2814,2843.09 2814,2866.63 2823.37,2876 2910,2876 v1(2910,2870) ; v1(2834,404) JMP5.3 ; JMP6.3 2834,556 v1(2836,556) ; v1(2840,2660) 2850,2660 2990,2520 v1(3070,2520) ; R22.1 v1(2880,680) ; R28.1 2891.97,1221.97 2909.13,1239.13 IC3.5 3059.13,1239.13 3090,1270 3090,1320 3109.13,1339.13 IC3.14 ; IC1.1.1 3040.83,2120 v1(3070,2120) ; C10.1 3147.83,1422.17 3180.87,1389.13 IC3.15 IC3.14 ; IC1.38 IC1.1 3325,2515 3360,2550 3520,2550 3554.13,2584.13 C4.1 ; J5.3 3350.39,1339.13 IC3.14
  Top Layer w30: RP1.1 1001.34,2601.34 1009.13,2609.13 R26.2 1050.87,2609.13 1121.97,2538.03 C11.1 1155,2525 1181.57,2551.57 J12.7 ; C12.1 1215,2345 1230,2360 1230,2420 1280,2470 1350,2470 1370.71,2449.29 ; 1427.83,2000 1740,2000 1780,2040 1780,2190 1758.86,2211.14 R18.2 ; IC5.2 1400.71,2369.13 RP2.1 1370.71,2449.29 ; C14.1 1876.1,2553.9 1840,2590 1420,2590 1370.71,2540.71 1370.71,2449.29
  Top Layer w40: CE1.2 249.09,1320 340,1320 440,1220 440,1150 ; D2.2 440,1150 ; v1(520,1150) 440,1150 ; IC7.3 802.83,1352.83 900.12,1450.12 CE2.2 1080.08,1529.92 v1(1080,1530) ; RP1.1 1001.34,2415.63 C20.1 ; JMP3.3@1071.97,2280 C20.1 ; C12.1 C20.1 ; v1(1210,1040) 1210.87,1039.13 R2.1 1241.97,1061.14 R14.1 ; IC5.4 1427.83,2235 C13.1 C8.1 1427.83,2000 1427.83,1953.27 J11.2 ; v1(1530,1400) 1530.08,1399.92 CE3.2 1530.08,1129.92 1607.64,1052.36 D3.2 ; IC8.3 2081.04,1251.04 2160.12,1330.12 CE4.2 ; v1(2370,1390) 2370.08,1389.92 CE4.2 ; C19.1 2467.83,568.03 C22.1 C7.1 ; v1(2570,890) 2569.13,889.13 R10.1 ; C5.1 2661.97,570.04 2701.97,610.04 2701.97,632.67 IC4.15 2701.97,715 C23.1 2590.87,769.13 2543.98,816.02 R10.1 ; C17.1 C16.1 2665,1015 2660,1020 ; J14.5 3344.13,2830 C3.1 3505.87,2804.13 3554.13,2755.87 C4.1 ; CE4.2 2459.88,1330.12 2660,1130 2660,1020 ; R10.1 2521.97,911.14 R12.1 2637.13,967.13 2660,990 2660,1020
  Bottom Layer w20: v1(2740,2770) 2740,2760 v1(2840,2660) ; v1(2910,2870) 2916,2876 3214,2876 J14.5 ; v1(3070,2120) v1(3070,2520)
IO0: IC1.25 J14.3 R11.2 | length 1817.7
  Top Layer w15: IC1.25 2675,1785 2710,1820 2730,1820 2760,1850 v1(2760,2270) ; v1(2710,2560) 2740,2560 2750,2570 v1(2790,2570) ; v1(2770,2870) 2799.5,2899.5 2990.5,2899.5 J14.3 3060,2722.01 R11.2
  Bottom Layer w15: v1(2710,2560) 2760,2510 v1(2760,2270) ; v1(2770,2870) 2710,2870 2690,2850 2690,2670 v1(2790,2570)
IO2: IC1.24 J13.5 | length 1334
  Top Layer w15: v1(2550,1880) 2555,1875 IC1.24
  Bottom Layer w15: J13.5 2363.15,2650 2490,2650 2680,2460 2680,1920 2640,1880 v1(2550,1880)
IO4: IC1.26 IC2.2 R19.1 | length 5925.6
  Top Layer w12: R19.1 560.87,2539.13 595.28,2504.72 ; v2(550,2800) 550,2770 595.28,2724.72 595.28,2504.72 ; v2(600,2930) 1110,2930 1120,2940 3450,2940 3600,2790 3600,2580 3520,2500 v2(3410,2500) ; IC2.2 611.87,2428.13 595.28,2444.72 595.28,2504.72 ; IC1.26 2725,1655 2750,1630 v2(3220,1630)
  Bottom Layer w12: v2(550,2800) 550,2880 v2(600,2930) ; v2(3220,1630) 3220,1774.75 3252,1806.75 3252,1833.25 3070,2015.25 3070,2070 3112.63,2112.63 3112.63,2162.63 3160,2210 3225.25,2210 3252,2236.75 3252,2372 3380,2500 v2(3410,2500)
IO5: IC1.29 J12.5 | length 2285.1
  Top Layer w12: v1(2260,2570) 2570,2570 2610,2530 2610,2414.54 2644.54,2380 2740,2380 2810,2310 2810,1980 2870,1920 2870,1820 2875,1815 IC1.29
  Bottom Layer w12: J12.5 1538.43,2620 2210,2620 v1(2260,2570)
IO10: IC1.18 J12.6 | length 1738.8
  Top Layer w12: v1(2120,2580) 2120,2480 v1(2170,2430) ; v1(2560,2180) 2610.94,2180 IC1.18
  Bottom Layer w12: J12.6 1480,2580 v1(2120,2580) ; v1(2170,2430) 2220,2430 2280,2370 2280,2210 2310,2180 v1(2560,2180)
IO12: IC1.14 R31.1 R32.2 | length 2880.3
  Top Layer w12: R31.1 441.97,1901.97 v1(460,1920) ; v1(2230,2350) 2230,2383.41 2220,2393.41 2220,2570 2244,2594 2636,2594 2675,2555 IC1.14
  Top Layer w40: R32.2 R31.1
  Bottom Layer w12: v1(460,1920) 510,1970 1510,1970 1890,2350 v1(2230,2350)
IO13: IC1.16 IC7.5 R2.2 | length 2816.7
  Top Layer w12: IC7.5 951.82,1240 v1(1070,1240) ; v1(1250,1320) 1184.75,1385.25 1184.75,1770 1206.75,1792 1802,1792 v1(2000,1990) ; v1(2160,2110) 2325,2275 IC1.16
  Top Layer w40: IC7.5 936.68,1223.32 1120.87,1039.13 R2.2
  Bottom Layer w12: v1(1070,1240) 1170,1240 v1(1250,1320) ; v1(2000,1990) 2100,1990 2160,2050 v1(2160,2110)
IO14: IC1.13 IC4.6 | length 2108.7
  Top Layer w8: v1(2610,590) 2610,600 2617.64,607.64 IC4.6
  Top Layer w15: v1(2710,2510) 2725,2495 IC1.13
  Bottom Layer w15: v1(2610,590) 2640,590 2710,660 2710,1813.94 2684.5,1839.44 2684.5,1860.56 2710,1886.06 v1(2710,2510)
IO15: IC1.23 J13.6 | length 1319
  Top Layer w15: v1(2540,1930) 2610.94,1930 IC1.23
  Bottom Layer w15: J13.6 2304.72,2610 2470,2610 2650,2430 2650,1980 2600,1930 v1(2540,1930)
IO21: IC1.33 IC2.16 | length 3088.8
  Top Layer w12: IC2.16 869.87,2350.13 880,2340 v1(880,2320) ; v1(2250,2540) 2263.94,2540 2273.94,2550 2560,2550 2592,2518 2592,2407.09 2637.09,2362 2728,2362 2790,2300 2790,1970 2830,1930 v1(2830,1910) ; v1(3010,1900) 3075,1835 IC1.33
  Bottom Layer w12: v1(880,2320) 880,2410 1014,2544 2250,2544 v1@2252,2546 ; v1(2830,1910) 2890,1910 2910,1930 2980,1930 v1(3010,1900)
IO22: IC1.36 IC2.19 | length 3626.6
  Top Layer w12: IC2.19 869.13,2409.13 880,2420 880,2490 v1(870,2500)
  Top Layer w20: v2(1080,2860) 1130,2910 2710,2910 2742,2878 2742,2858.4 2750,2850.4 v2(2750,2830) ; v2(3220,1820) 3225,1815 IC1.36
  Bottom Layer w20: v1(870,2500) 870,2650 v2(1080,2860) ; v2(2750,2830) 2750,2810 2830,2730 2860,2730 3040,2550 3040,2000 v2(3220,1820)
IO25: IC1.10 RP2.3 | length 2001.3
  Top Layer w12: v1(1280,2340) 1280,2387.17 RP2.3 ; v1(1330,2520) 1330,2540 1423,2633 2797,2633 2875,2555 IC1.10
  Bottom Layer w12: v1(1280,2340) 1330,2390 v1(1330,2520)
IO26: IC1.11 Q2.2 R7.1 | length 1603.8
  Top Layer w12: R7.1 2059.96,2059.96 2200,2200 2200,2590 2222,2612 2781.94,2612 2825,2568.94 IC1.11
  Top Layer w20: R7.1 2050,2009.17 2050,1880 2068.27,1861.73 Q2.2
IO27: IC1.12 J9.2 | length 3386.3
  Top Layer w12: J9.2 1481.57,898.43 1430,950 1430,1490 1598,1658 2303.25,1658 2335.25,1690 v1(2370,1690) ; v1(2470,1690) 2520,1690 2680,1850 v1@2700,1850 ; IC1.12 2775,2415 2870,2320 v1(2870,2280)
  Bottom Layer w12: v1(2370,1690) v1(2470,1690) ; v1(2710,1850) 2720,1850 2870,2000 v1(2870,2280)
IO32: IC1.8 IC3.12 | length 1446.2
  Top Layer w12: v1(2950,1900) 2950,1960 2890,2020 2890,2210 2975,2295 IC1.8 ; v1(3180,1240) 3255.31,1240 IC3.12
  Bottom Layer w12: v1(2950,1900) 3070,1780 3070,1400 3180,1290 v1(3180,1240)
IO33: IC1.9 IC3.11 | length 1517.9
  Top Layer w12: IC1.9 2925,2285 2860,2220 2860,2000 2920,1940 2920,1860 v1(2930,1850) ; v1(3150,1190) 3255.31,1190 IC3.11
  Bottom Layer w12: v1(2930,1850) 3040,1740 3040,1380 3150,1270 v1(3150,1190)
IO34: IC1.6 R15.1 | length 3826.6
  Top Layer w12: R15.1 2234.84,410 v1(2310,410) ; IC1.6 3075,2260.28 3124.01,2211.27 3124.01,1964.01 3090,1930 v1(3090,1870)
  Bottom Layer w12: v1(2310,410) 2310,310 2430,190 3216.81,190 3510,483.19 3510,1390 3450,1450 3280,1450 3090,1640 v1(3090,1870)
IO35: IC1.7 J6.2 R3.1 | length 4308.4
  Top Layer w20: R3.1 2013.98,257.6 J6.2 ; IC1.7 3025,2305 2920,2200 2920,2040 2940,2020 v1(3100,2020)
  Bottom Layer w20: J6.2 2103.57,168 3238,168 3550,480 3550,1410 3320,1640 3320,1940 3240,2020 v1(3100,2020)
MISO: IC1.31 J12.2 J13.2 | length 2160.7
  Top Layer w20: J12.2 1673.7,2813.7 1710,2850 2458.43,2850 J13.2 ; IC1.31 2980,1750.67 v2(2980,1980)
  Bottom Layer w20: J13.2 2529.6,2780 2738,2571.6 2738,2570.43 2980,2328.43 2975,2323.43 2980,2318.43 v2(2980,1980)
MOSI: IC1.37 J12.3 J13.3 | length 2817.5
  Top Layer w20: J12.3 1675.28,2880 v1(2350,2880) ; v2(3220,2250) 3220,1900 3275,1845 IC1.37
  Bottom Layer w20: v1(2350,2880) 2430,2800 J13.3 2570,2920 2770,2920 2800,2890 2800,2810 2814,2796 2814,2793.37 2847.37,2760 2880,2760 3130,2510 3130,2319.6 3112,2301.6 3112,2268 3130,2250 v2(3220,2250)
NetC1_1: C1.1 IC2.4 | length 140.1
  Top Layer w12: C1.1 541.97,2408.03 560.87,2389.13 IC2.4
NetC1_2: C1.2 IC2.5 | length 141.1
  Top Layer w12: C1.2 541.97,2351.97 559.13,2369.13 IC2.5
NetC2_1: C2.1 IC2.6 | length 331.7
  Top Layer w12: C2.1 441.97,2318.03 480,2280 576.93,2280 615.97,2319.04 615.97,2341.1 625,2350.13 IC2.6
NetC6_1: C6.1 J10.2 R23.2 | length 739.2
  Top Layer w30: C6.1 2741.97,370 ; J10.2 2741.97,277.56 2741.97,370 ; R23.2 3060,460 2955,355 2756.97,355 2741.97,370
NetC6_2: C6.2 IC4.8 | length 56.3
  Top Layer w8: C6.2 2760.43,561.73 IC4.8
NetC7_2: C7.2 IC4.1 | length 91
  Top Layer w10: C7.2@2561.97,683.27 2561.97,685.96 2591.55,685.96 2599.53,693.94 2618.58,693.94 2619.44,693.09 2626.57,685.96 2643.09,685.96 IC4.1
NetC9_1: C9.1 IC3.8 R17.2 | length 356.8
  Top Layer w20: IC3.8 3120.87,1089.13 3149.96,1060.04 R17.2
  Top Layer w40: C9.1 3129.13,909.13 3149.96,929.96 R17.2
NetC9_2: C9.2 IC3.7 R16.2 | length 288.1
  Top Layer w20: C9.2 2969.96,917.01 R16.2 2969.96,1050.04 2950,1070 2950,1120 2969.13,1139.13 IC3.7
NetC14_2: C14.2 IC5.7 | length 228.4
  Top Layer w20: IC5.7 1719.13,2369.13 1767.83,2417.83 C14.2
NetC15_1: C15.1 IC5.1 | length 94.9
  Top Layer w20: IC5.1 1461.97,2463.27 C15.1
NetC15_2: C15.2 IC5.8 | length 98.6
  Top Layer w20: C15.2 1650.94,2454.29 IC5.8
NetC16_2: C16.2 IC3.3 J5.4 Q1.3 R27.1 | length 1073.6
  Top Layer w20: C16.2 2746.73,1123.27 2720,1150 2720,1280 2751.14,1311.14 R27.1 2811.97,1331.97 2830,1350 2850,1350 ; Q1.3 2847.52,1352.48 2850,1350 ; v1(3140,1380) 3100,1380 3059.13,1339.13 IC3.3 2950.87,1339.13 2940,1350 2850,1350
  Bottom Layer w20: v1(3140,1380) 3154.02,1365.98 J5.4
NetC17_2: C17.2 IC3.6 | length 149.3
  Top Layer w20: C17.2 2903.89,1123.27 2942.42,1161.8 2942.42,1172.42 2959.13,1189.13 IC3.6
NetC18_1: C18.1 CE5.1 IC5.5 | length 233.5
  Top Layer w20: C18.1 1611.97,2230.16 IC5.5 1774.17,2269.13 CE5.1
NetC18_2: C18.2 R18.1 | length 83.3
  Top Layer w30: C18.2 1619.84,2087.13 R18.1
NetC21_2: C21.2 IC2.8 | length 168
  Top Layer w12: C21.2 581.97,2251.97 626.13,2296.13 IC2.8
NetC22_2: C22.2 IC4.3 | length 227.9
  Top Layer w8: C22.2 2460,650 2470,640 2585.5,640 2590.89,645.39 2614.61,645.39 2624.11,654.88 IC4.3
NetC23_2: C23.2 IC4.12 | length 228.9
  Top Layer w8: C23.2 v1@2819.13,769.13 ; IC4.12 2804.88,654.88 v1(2820,670)
  Bottom Layer w8: v1(2820,670) v1(2820,770)
NetCE5_2: CE5.2 J11.1 | length 720.8
  Top Layer w30: J11.1 1799.13,1909.13 2069.76,2179.76 CE5.2
NetD2_1: D2.1 IC7.2 L1.1 | length 613.5
  Top Layer w40: D2.1 529.37,883.39 L1.1 699.13,939.13 735.9,975.9 IC7.2
NetD3_1: D3.1 IC8.2 L2.1 | length 694
  Top Layer w40: D3.1 1731.97,808.03 1770.87,769.13 L2.1 1969.13,769.13 2014.11,814.11 IC8.2
NetIC2_1: IC2.1 J4.4 | length 347.4
  Top Layer w12: J4.4 613.28,2778.3 613.28,2499.71 648.97,2464.02 IC2.1
NetIC2_9: IC2.9 JMP1.2 | length 276.2
  Top Layer w12: IC2.9 702.97,2234.61 699.28,2230.92 699.28,2090.72 720,2070 JMP1.2
NetIC2_10: IC2.10 JMP2.2 | length 491.2
  Top Layer w12: IC2.10 721.97,2228.16 717.28,2223.46 717.28,2114.8 745.39,2086.69 822.56,2086.69 840.56,2104.69 925.31,2104.69 940,2090 JMP2.2
NetIC2_11: IC2.11 JMP3.2 | length 617.1
  Top Layer w12: IC2.11 743.97,2294.13 743.97,2224.7 735.28,2216.01 735.28,2122.26 752.85,2104.69 815.1,2104.69 833.1,2122.69 883.63,2122.69 890.66,2129.71 890.66,2210.66 899.13,2219.13 JMP3.2
NetIC2_12: IC2.12 IC2.14 R20.1 | length 484.2
  Top Layer w12: IC2.12 761.97,2217.25 753.28,2208.55 753.28,2129.71 760.31,2122.69 807.65,2122.69 814.68,2129.71 814.68,2164.68 819.13,2169.13 R20.1 859.96,2260.04 823.87,2296.13 IC2.14
NetIC2_13: IC2.13 R5.2 | length 128.2
  Top Layer w12: IC2.13 780.97,2172.14 R5.2
NetIC2_17: IC2.17 RP1.2 | length 143.6
  Top Layer w12: IC2.17 880.87,2369.13 920.87,2329.13 RP1.2
NetIC2_21: IC2.21 J4.2 | length 342.9
  Top Layer w12: IC2.21 834.97,2535.03 v1(835.03,2535.03)
  Bottom Layer w12: J4.2 808.43,2561.64 v1(835.03,2535.03)
NetIC2_23: IC2.23 R26.1 | length 220.2
  Top Layer w12: IC2.23 780.97,2530.97 859.13,2609.13 R26.1
NetIC2_24: IC2.24 J4.1 | length 357.9
  Top Layer w12: IC2.24 761.97,2551.97 906.85,2696.85 J4.1
NetIC2_26: IC2.26 J4.3 | length 302.8
  Top Layer w12: J4.3 710,2624.04 721.97,2612.07 IC2.26
NetIC2_27: IC2.27 R25.1 | length 189.5
  Top Layer w10: R25.1 690.87,2619.13 703.68,2606.32 703.68,2482.84 IC2.27
NetIC3_2: IC3.2 Q1.1 | length 92.4
  Top Layer w20: Q1.1 3005.16,1391.73 IC3.2
NetIC3_4: IC3.4 R27.2 R28.2 | length 282.1
  Top Layer w20: R27.2 2891.97,1267.13 R28.2 2938.86,1311.14 2960.87,1289.13 IC3.4
NetIC4_9: IC4.9 JMP5.2 | length 266.8
  Top Layer w8: IC4.9 2778.12,607.64 2800,585.76 2800,500 2820,480 2880,480 2890,470 JMP5.2
NetIC4_10: IC4.10 JMP6.2 | length 190
  Top Layer w8: IC4.10 2816.61,623.39 2890,550 JMP6.2
NetIC4_13: IC4.13 R23.1 R24.2 | length 431.1
  Top Layer w8: IC4.13 2761.06,670 2789.8,670 2798,678.2 2798,679.11 2824.89,706 2970,706 ; R24.2 2970,706 ; R23.1 3060,720 3046,706 2970,706
NetIC4_14: IC4.14 R22.2 R24.1 | length 269.6
  Top Layer w8: IC4.14 2785.47,686.38 2819.09,720 2870,720 2880,730 R22.2 R24.1
NetIC5_3: IC5.3 RP2.2 | length 174
  Top Layer w20: RP2.2 1331.34,2311.34 1339.13,2319.13 IC5.3
NetIC7_4: IC7.4 R14.2 R29.2 | length 510.2
  Top Layer w40: IC7.4 869.76,1309.76 910,1350 1080,1350 1151.97,1278.03 R29.2 R14.2
NetIC8_4: IC8.4 R12.2 R30.2 | length 505.2
  Top Layer w40: IC8.4 2147.97,1167.97 2170,1190 2400,1190 2441.97,1148.03 R30.2 R12.2
NetIC8_5: IC8.5 R10.2 | length 350.6
  Top Layer w40: IC8.5 2214.9,1035.1 2360.87,889.13 R10.2
NetJ5_1: J5.1 R17.1 | length 173.5
  Top Layer w40: R17.1 3309.13,1009.13 3370.71,1070.71 J5.1
NetJ5_2: J5.2 R16.1 | length 882.1
  Top Layer w20: R16.1 3059.13,1009.13 3030,980 3030,870 3050,850 3300,850 3480,1030 3480,1111.1 J5.2
NetJ6_3: J6.3 R15.2 | length 163.3
  Top Layer w20: R15.2 2109.96,260.04 J6.3
NetJ7_2: J7.2 Q2.3 R6.2 | length 321.3
  Top Layer w20: R6.2 2089.87,1779.13 2154.03,1843.29 2154.03,1844.03 2176.42,1866.42 Q2.3 J7.2
NetJ8_3: J8.3 Q3.3 R8.2 | length 300.2
  Top Layer w40: Q3.3 3283.98,656.69 R8.2 3330.87,759.13 J8.3
NetR4_1: R4.1 RP1.3 | length 73.1
  Top Layer w12: R4.1 919.96,2459.72 RP1.3
RX0: IC1.34 J14.1 | length 1226
  Top Layer w15: IC1.34 3125,1875 3143.51,1893.51 3143.51,2286.49 v1(3140,2290)
  Bottom Layer w15: J14.1 3160,2530 3160,2310 v1(3140,2290)
RX2: IC1.27 Q3.2 R9.1 | length 1686.3
  Top Layer w20: v1(2770,1670) 2770,1740.67 IC1.27
  Top Layer w40: Q3.2 3270.12,529.13 R9.1 3283.98,463.98 v1(3280,460)
  Bottom Layer w20: v1(2770,1670) 2770,1490 3280,980 v1(3280,460)
SCK: IC1.30 J12.4 J13.4 | length 2318.4
  Top Layer w12: v1(2630,2560) 2630,2420 2650,2400 2750,2400 2830,2320 2830,1990 2890,1930 2890,1850 2925,1815 IC1.30
  Bottom Layer w12: J13.4 2390.79,2720.79 2519.21,2720.79 2630,2610 v1(2630,2560)
  Bottom Layer w20: J12.4 1536.85,2840 2271.57,2840 J13.4
TX0: IC1.35 J14.2 | length 1185.8
  Top Layer w20: IC1.35 3175,2335 v1(3190,2350)
  Bottom Layer w20: J14.2 3190,2600 v1(3190,2350)
TX2: IC1.28 J8.2 | length 1881.6
  Top Layer w20: IC1.28 2825,1695 2850,1670 3440,1670 3530,1580 3530,640 3461.57,571.57 J8.2
VS: C8.2 C13.2 IC5.6 JMP4.2 | length 550.3
  Top Layer w20: JMP4.2 1349.13,2139.13 v1(1350,2140) ; v1(1480,2180) 1489.13,2189.13 C13.2 ; C8.2 C13.2 ; IC5.6 1569.13,2319.13 1536.1,2286.1 C13.2
  Bottom Layer w20: v1(1350,2140) 1390,2180 v1(1480,2180)
pads on no net: IC1.4 IC1.5 IC1.17 IC1.19 IC1.20 IC1.21 IC1.22 IC1.32 IC2.7 IC2.20 IC2.25 IC3.9 IC3.10 IC3.13

## Polygon pours and split planes (outlines as drawn)
GND on Bottom Layer "Bottom-GND" (solid, shelved, pour order 0): 50,50 50,2980 3600,2980 3610,2980 3610,50 50,50

## Silkscreen, mask and mechanical layers (free items; w line width, h text height)
Top Overlay:
  text "Stepper motor" at 600,2950 h60
  text "Container RFID" at 1290,2950 h60
  text "Tray RFID" at 2230,2950 h60
  text "Programmer" at 2920,2930 h60
  text "Battery balancing" at 110,2200 h60 r90
  text "RGB Led" at 2240,2150 h60
  text "Speaker" at 1420,1750 h60
  text "BMS balancing" at 110,1660 h60 r90
  text "Weight sensor" at 3620,1060 h60 r90
  text "Battery input" at 110,520 h60 r90
  text "Nextion screen" at 3620,450 h60 r90
  text "BMS output" at 460,60 h60
  text "End stop" at 1970,60 h60
  text "Microphone" at 2580,60 h60
  text "Charger input" at 840,50 h60
  text "Solenoid" at 1380,50 h60
Mechanical 1:
  the board outline again, w10

## Text inside footprints (layer, text, board x,y; h text height)
CE1: Top Overlay "+" at 482.36,1363.31 h30
CE2: Top Overlay "+" at 1314.33,1492.44 h30
CE3: Top Overlay "+" at 1764.33,1362.44 h30
CE4: Top Overlay "+" at 2604.33,1372.44 h30